# Altium PCB DPM20140124.PcbDoc (part 2 of 3)
Units mil, origin at the board's own origin, x right, y up, seen from the top; angles counter-clockwise.
Board outline 4950 x 7375 mil, 2 copper layers (Top Layer, Bottom Layer); 198 components, 330 nets, 1077 pads, 152 vias.
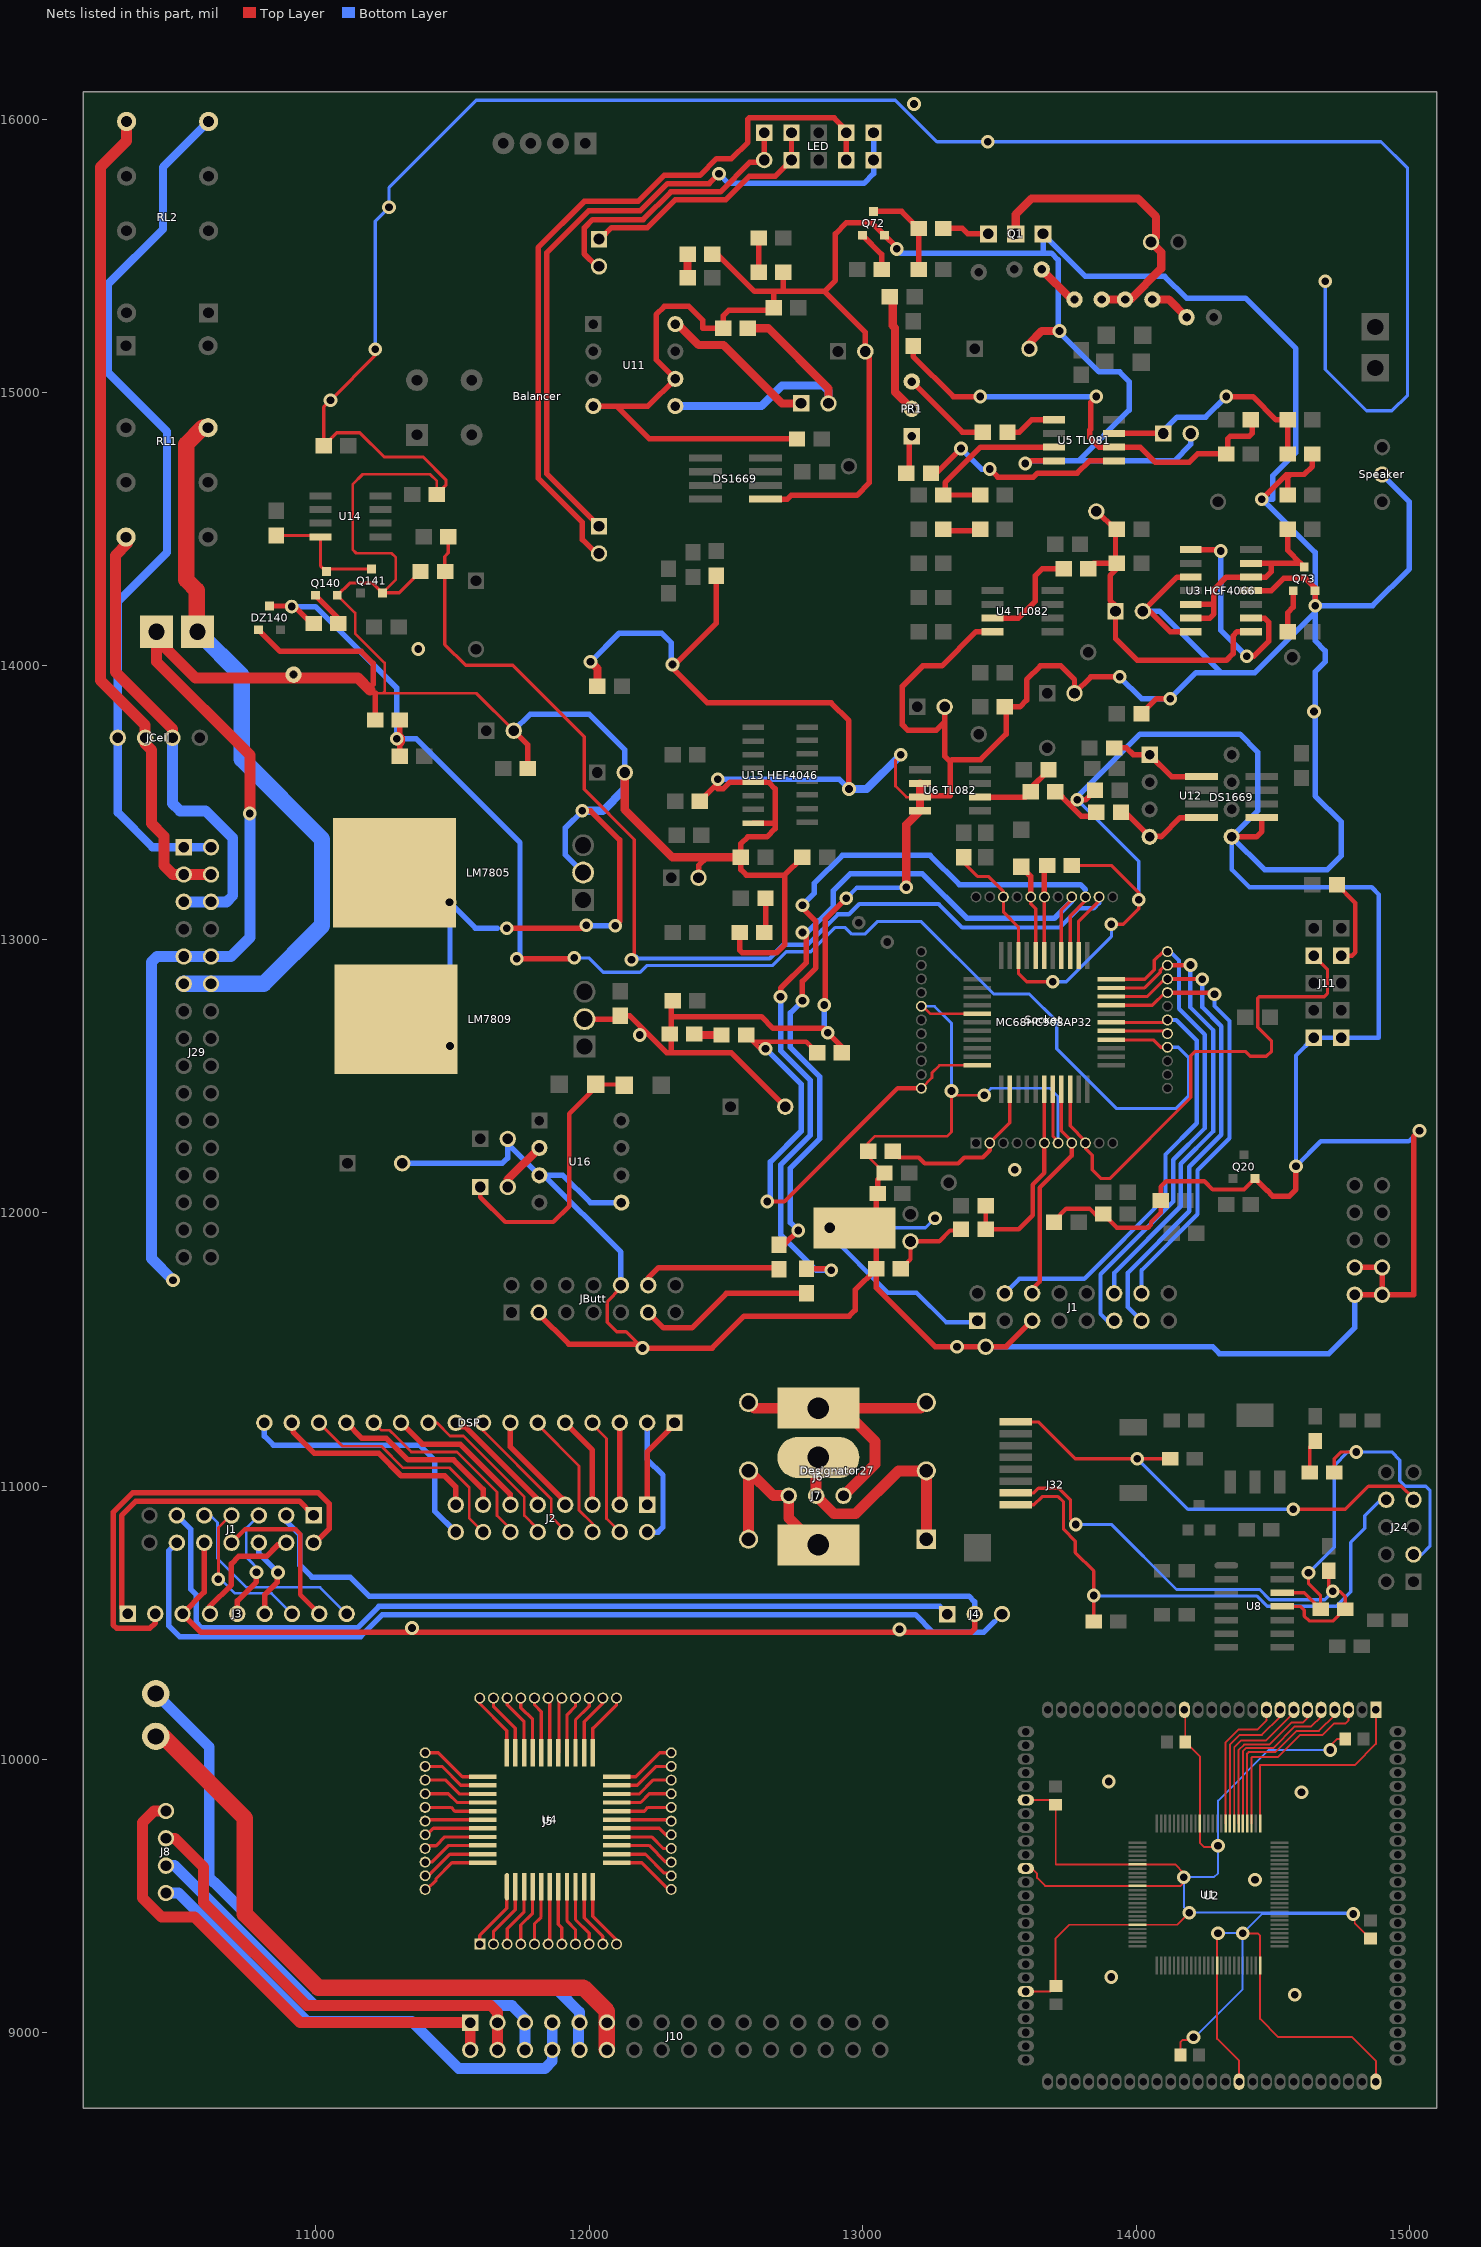
[diagram p2: the nets of this part, all layers, seen from the top]

## Via types
v1: diameter 50, hole 28, Top Layer to Bottom Layer, 152 vias

## Nets (pads, with @x,y where several pads share a name; then routed paths per layer and width w, separated by ;. In a path a pad name is that pad's centre, name@x,y a point inside that pad or via, vN(x,y) a via of type N, cw(c..) or ccw(c..) an arc to the next point about the centre after c; other vN are vias at no path point) (continued)
CS: J24.3 R92.2@14675,10550 R96.1 U8.12 | length 1637.4
  Top Layer w12: U8.12@14535,10610 14615,10610 R92.2@14675,10550 14675,10599 14631,10643 v1(14631,10683) ; R96.1@14725,11050 14725,11100 14750,11125 v1(14805,11125)
  Bottom Layer w12: v1(14631,10683) 14725,10777 14725,11075 14775,11125 v1(14805,11125) 14935,11125 14965,11095 14965,11020 14985,11000 15060,11000 15075,10985 15075,10780 15045,10750 J24.3@15015,10750
CS_: J32.2 R1.1 R92.1@14765,10550 U8.11 | length 1850.6
  Top Layer w12: J32.2@13560,10975 13626,10975 13643,10992 13718,10992 13760,10950 13760,10880 v1(13780,10860) ; U8.11@14535,10560 14601,10560 14615,10546 14615,10525 14633,10507 14722,10507 R92.1@14765,10550 14765,10595 14745,10615 v1(14720,10615) 14705,10630 R1.1@14705,10690
  Bottom Layer w12: v1(13780,10860) 13910,10860 14148,10622 14452.75,10622 14489.75,10585 14690,10585 v1(14720,10615)
DAT1: J24.7 J32.8 R95.1 | length 1776.3
  Top Layer w12: J32.8@13560,11234.84 13642.16,11234.84 13777,11100 v1(14005,11100) R95.1@14125,11100 ; v1@14570,10915 v1(14575,10915) 14765,10915 14850,11000 14970,11000 15015,10955 J24.7@15015,10950
  Bottom Layer w12: v1@14000,11100 v1(14005,11100) 14190,10915 v1(14575,10915)
DAT2: J24.8 J32.1 R90.1@13845,10505 | length 1998.1
  Top Layer w12: 13620,10931.69 13626.69,10931.69 13657,10962 13715,10962 13735,10942 13735,10842 13778,10799 13778,10757 13845,10690 v1(13845,10600) R90.1@13845,10505
  Bottom Layer w12: v1(13845,10600) 13847,10598 14442.81,10598 14479.81,10561 14732.06,10561 14785,10613.94 14785,10794 14837,10846 14837,10892 14895,10950 J24.8@14915,10950
ENCENDIDO: Q140.2 Q141.2 R140.2 U14.4 | length 467.9
  Top Layer w12: R140.2@10856,14477 11012,14477 U14.4@11017,14472 11017,14367 Q140.2@11039,14345 11048,14354 Q141.2@11204,14354
ENTREERES: R53.1 R54.2 | length 165.6
  Top Layer w30: R53.1@13655,15450 13765,15340 R54.2@13775,15340
FILTROIN: C55.2 R72.1 | length 138.3
  Top Layer w20: R72.1@13295,14500 13300,14495 13420,14495 C55.2@13430,14500
FLITMIC: C18.1 R12.1 | length 100.7
  Top Layer w30: C18.1@12385,12654 12389,12650 R12.1@12484,12650
FUSEIN: 
GND: C1.2 C2.2 C3.2 C4.2 C5.2 C6.2 U1.15 U1.31 U1.36 U1.45 U1.65 U1.75 U2.15 U2.31 U2.36 U2.45 U2.65 U2.75 | length 7267.3
  Top Layer w7: U2.45@13597,9152 13687,9152 C4.2@13707,9172 13705,9174 13705,9345 13756.02,9396.02 U1.45@14005,9396.02 14151.02,9396.02 v1(14195,9440) ; U2.36@13597,9602 13618,9602 13638,9582 13638,9567 13667.25,9537.75 U1.36@14005,9537.75 14162.75,9537.75 14175,9550 v1(14175,9570) 14175,9585 14143.51,9616.49 U1.31@14005,9616.49 13706.49,9616.49 13706.49,9833.51 C3.2@13705,9835 13688,9852 U2.31@13597,9852 ; C5.2@14163.07,8920 14163.07,8968.07 14170,8975 14200,8975 v1(14210,8985) ; U2.15@14177,10182 14180,10179 C2.2@14180,10065 14233.35,10011.65 U1.15@14233.35,9766.09 14233.35,9696.65 14250,9680 v1@14290,9680 ; v1@14296.34,9363.66 U1.65@14296.34,9246.41 14296.34,8978.66 14377,8898 U2.65@14377,8822 ; v1@14390,9363.66 14446.34,9363.66 14453.82,9356.18 U1.75@14453.82,9246.41 14453.82,9051.18 14520,8985 14790,8985 14877,8898 U2.75@14877,8822 ; v1@14702.5,10042.5 14735,10075 C1.2@14765,10075 ; v1@14800,9430 14800,9402.07 C6.2@14857,9345.07
  Bottom Layer w7: 14165,8940 14170,8940 ; v1@14212.5,8982.5 14390,9160 v1(14390,9365) ; v1(14300,9365) v1(14390,9365) ; v1(14710,10035) 14485,10035 14300,9850 v1(14300,9685) 14300,9585 14285,9570 v1(14175,9570) 14175,9460 v1(14195,9440) 14790,9440 v1(14795,9435) 14460,9435 v1(14390,9365)
  other v1: 14580,9140 13910,9205 14435,9560 14605,9880 13900,9920
GND2: J1.3@10892,10893 J1.10@10592,10793 J3.3 J4.2 | length 6057.7
  Top Layer w20: J1.10@10592,10793 10592,10612 J3.3@10513,10533 10581,10465 13397,10465 13410,10478 J4.2@13410,10532
  Bottom Layer w20: J1.3@10895,10901 10895,10896 J1.3@10892,10893 10892,10872 10942,10822 10942,10711 10986,10667 11126,10667 11195,10598 13389,10598 13410,10577 J4.2@13410,10532
  other v1: 13135,10476 11352,10481
GNDA: "U3 HCF4066.3" "U3 HCF4066.7" "U3 HCF4066.11" "U4 TL082.4" "U5 TL081.4" "U6 TL082.2" "U6 TL082.3" "U6 TL082.4" "U15 HEF4046.5" "U15 HEF4046.8" ?.3 BATTERY.1 C10.1 C11.2 C12.2 C13.1 C14.1 C15.1 C16.1 C17.2 C18.2 C19.2 C20.1 C33.2 C34.2 C35.2 C48.2 C49.2 C52.2@14555,14625 C53.2@14025,14200 C58.2 C60.2 C61.2 C62.2 C63.2 C64.2 C66.2 C67.2 C68.2 C140.1 C141.1 C151.2 C152.2 C200.2 C201.1 C204.1 C205.1 C206.1 DS1669.5 DZ140.1 J1.1@13420,11605 J1.5@13620,11605 J11.9 J11.10 J29.9 J29.10 JButt.3 JButt.10 LM7805.2 LM7809.2 MC68HC908AP32.7 MC68HC908AP32.31 MC68HC908AP32.38 pad.0@10919,13968 pad.2 pad.3 pad.4 pad.5@14800,11700 pad.34 Q1.3 Q20.3 Q72.3 Q73.3 Q140.3 Q141.3 R16.1 R22.2 R26.1 R81.2 R86.2 R89.1 R144.1 R146.1 R151.2 R152.1 R153.2 R201.1 Socket.7 Socket.31 Socket.38 Speaker.2 U11.4 U11.6 U12.5 U16.3 U16.5 | length 57911.3
  Top Layer w10: Q140.3@11079,14258 11144,14193 11144,14119 11252,14011 11252,13906 11246,13900 ; 11220,13900 11246,13900 ; Q141.3@11244,14267 11293,14316 11293,14396 11277,14412 11148,14412 11135,14425 11135,14664 11172,14701 11418,14701 11443,14676 C140.1@11443,14627 ; C62.2@11724,13763 11587,13900 11246,13900 ; 13055,11730 C11.2@13055,11795 ; C14.1@13080,12145 13020,12205 C16.1@13020,12225 13020,12255 13045,12280 13310,12280 13325,12295 v1(13325,12445) 13340,12430 v1(13445,12430) ; v1(13140,13675) 13120,13655 13120,13560 13160,13520 13210,13520 ; Socket.38@13215,12755 13220.15,12755 13247.15,12728 MC68HC908AP32.38@13419,12728
  Top Layer w12: Q140.3@11079,14258 11124,14303 11208,14303 Q141.3@11244,14267 11305,14267 R144.1@11383,14345 ; v1@11218,15152 11218,15136 v1(11054,14972) 11029,14947 C64.2@11029,14805 11077,14853 11161,14853 11250,14764 11393,14764 11476,14681 11476,14660 C140.1@11443,14627 ; JButt.10@12116,11735 12116,11725 12066,11675 12066,11599 12100,11565 12135,11565 12181,11519 v1(12195,11505) ; C13.1@13370,13300 13370,13280 13420,13230 13460,13230 13515,13175 Socket.31@13515,13155 13515,13100 13570,13045 MC68HC908AP32.31@13570,12941 13570,12875 13600,12845 v1(13695,12845) ; MC68HC908AP32.7@13696,12451 13696,12280.57 13715,12261.57 Socket.7@13715,12255 ; R26.1@13765,13270 13910,13270 14010,13170 v1(14010,13145) 14010,13112 13953,13055 v1(13910,13055)
  Top Layer w16: C20.1@13700,11965 13700,11970 13745,12015 13830,12015 13850,11995 C17.2@13880,11995 13930,11945 14045,11945 14055,11955 14055,11965 14090,12000 R22.2@14090,12045 14090,12095 14110,12115 14250,12115 14280,12085 14395,12085 Q20.3@14435,12125
  Top Layer w20: DZ140.1@10791,14132 10870,14053 11166,14053 11210,14009 11210,13932 ; R146.1@11217,13802 11217,13897 11220,13900 ; LM7805.2@11288,13244 11299,13244 LM7805.2@11378,13165 ; v1@11698,13040 11975,13040 v1@11990,13055 ; C62.2@11724,13763 11775,13712 C60.2@11775,13625 ; JButt.3@11816,11635 11813,11632 11926,11519 v1@12181,11519 ; v1(11975,13470) 12005,13470 12111,13364 12111,13066 v1(12095,13050) ; LM7809.2@11983,12708 12102,12708 C68.2@12114,12720 12149,12720 12283.5,12585.5 12300,12585.5 ; U11.4@12015,14950 12215,14950 U11.6@12315,15050 12245,15120 12245,15285 12275,15315 12365,15315 12415,15265 12415,15235 C204.1@12490,15235 12490,15280 12510,15300 12675,15300 C201.1@12675,15310 12675,15370 ; 12105,14945 12220,14830 R153.2@12760,14830 ; U16.5@12116,12035 U16.5@12118,12037 ; v1(12195,11505) 12450,11505 12567,11622 12951,11622 12973,11644 12973,11718 C11.2@13050,11795 ; C15.1@12305,12775 12300,12775 12300,12710 ; C151.2@12400,13225 12400,13270 12430,13300 ; R151.2@12405,13505 v1@12470,13570 ; C206.1@12450,15505 12470,15505 12605,15370 12675,15370 ; R201.1@12465,14330 12465,14156 12303,13994 12432,13865 12885,13865 12950,13800 v1(12950,13550) ; v1(12470,13585) v1@12470,13570 ; C10.1@12550,13025 12550,12960 12560,12950 12685,12950 12715,12980 12715,13235 ; 12600,13424.96 12600.04,13425 12680,13425 ; 12600,13574.96 12599.96,13575 ; DS1669.5@12645,14610 12725,14610 12739,14624 12979,14624 13025,14670 13025,15135 C200.2@13010,15150 13010,15220 12860,15370 ; C205.1@12710,15440 12710,15370 ; C67.2@12717,12388 12519.5,12585.5 12300,12585.5 ; C152.2@12780,13300 12715,13235 ; v1(12860,12760) 12863,12763 12863,13073 v1(12940,13150) ; C19.2@12924,12585 12924,12607 v1(12873,12658) 12857,12674 12673,12674 12630,12717 12307,12717 12300,12710 ; C14.1@13080,12145 13055,12120 C12.2@13055,12070 13050,12065 C11.2@13050,11795 ; v1(13125,15525) 13125,15530 Q72.3@13080,15575 13035,15620 12940,15620 12900,15580 12900,15410 12860,15370 ; 13250,13525 13320,13525 13320,13650 ; C35.2@13300,13850 13300,13795 ; 13475,14125 13415,14125 13290,14000 13220,14000 13145,13925 13145,13785 13165,13765 13270,13765 13300,13795 ; v1@13610,14750 13700,14750 ; J1.5@13620,11605 13525,11510 pad.34@13450,11510 v1(13345,11510) 13265,11510 13050,11725 C11.2@13050,11795 ; R89.1@13705,13540 13710.17,13540 13755.17,13495 ; R86.2@13830,13450 13800.17,13450 13755.17,13495 ; R16.1@13850,13545 13815,13510 v1(13785,13510) 13770,13495 13755.17,13495 ; v1(13940,13960) 13835,13960 C33.2@13775,13900 13775,13950 13725,14000 13650,14000 13600,13950 13600,13875 13575,13850 R81.2@13520,13850 13525,13845 13525,13750 13432,13657 13327,13657 13320,13650 ; C48.2@14020,13825 14075,13880 v1(14125,13880) ; 14200,14125 14125,14125 14050,14200 C53.2@14025,14200 14150,14325 14200,14325 ; U12.5@14350,13375 14440,13375 14460,13395 DS1669.5@14460,13445 ; 14420,14275 14495,14275 14540,14320 14620,14320 14655,14285 Q73.3@14655,14275 v1(14655,14220) ; Q20.3@14435,12125 14477.5,12082.5 14478.2,12082.5 14499.7,12061 14561,12061 14585,12085 v1(14585,12170) ; v1(14460,14610) 14550,14700 14565,14700 ; C52.2@14555,14625 14555,14690 14565,14700 ; C49.2@14645,14775 14645,14730 14615,14700 14565,14700 ; pad.5@14800,11700 pad.3@14900,11700 ; pad.4@14800,11800 pad.2@14900,11800 pad.3@14900,11700 ; v1@15036.5,12299.5 15015,12278 15015,11700 pad.3@14900,11700 ; 12300,12585.5 12300,12710 ; v1@12470,13570 12470,13550 12490,13550 12515,13575 12599.96,13575 ; 12599.96,13575 12655,13575 12680,13550 12680,13425 ; 12675,15370 12710,15370 ; 12680,13425 12680,13405 12650,13375 12580,13375 12555,13350 R152.1@12555,13300 12555,13255 12575,13235 12715,13235 ; 12710,15370 12860,15370 ; 13300,13795 13300,13670 13320,13650
  Top Layer w30: v1(12005,14015) 12030,13990 C141.1@12030,13925 ; C61.2@12130,13610 12130,13475 12305,13300 12430,13300 R152.1@12555,13300 ; v1(13160,13190) 13160,13420 13210,13470 ; 13210,13475 13210,13520 13210,13570 ; C58.2@13610,15160 13610,15180 13655,15225 v1(13720,15225)
  Top Layer w40: BATTERY.1@10418,14125 BATTERY.1@10418,14098 ; v1(10759,13460) 10759,13674 10418,14015 BATTERY.1@10418,14098 ; 11199,13911 11154,13956 10560,13956 BATTERY.1@10418,14098
  Bottom Layer w10: Socket.38@13215,12755 13263,12755 13325,12693 v1(13325,12445) ; v1(13445,12430) 13470,12455 13685,12455 13715,12425 Socket.7@13715,12255
  Bottom Layer w12: v1(11218,15158) 11218,15627 v1(11268,15677) 11268,15750 11587,16069 13120,16069 13272,15917 v1(13458,15917) 14896,15917 14993,15820 14993,14990 14936,14933 14843,14933 14692,15084 v1(14692,15407) ; ?.3@12880,11945 13230,11945 v1(13265,11980) ; v1(13695,12845) 13745,12845 13910,13010 v1(13910,13055) ; v1(13785,13510) 14010,13285 v1(14010,13145)
  Bottom Layer w16: ?.3@12880,11920 13092.27,11707.73 13197.27,11707.73 13305,11600 J1.1@13400,11600 ; v1(12940,13150) 12978,13188 13158,13188 v1(13160,13190) ; U12.5@14350,13375 14350,13255 14415,13190 14862,13190 14888,13164 14888,12640 J11.10@14750,12640 J11.9@14650,12640 14585,12575 v1(14585,12170) 14676,12261 14992,12261 ; 14998,12261 v1(15037,12300)
  Bottom Layer w20: C63.2@11316,12181 11683,12181 11702,12200 C66.2@11702,12253 ; v1(11489,13136) v1@11491,13134 ; v1(11491,12610) v1@11491,13134 ; 11664,13041 11584,13041 v1@11491,13134 ; C66.2@11702,12270 C66.2@11702,12253 ; C62.2@11724,13763 11784,13823 12001,13823 12130,13694 C61.2@12130,13610 ; U16.3@11818,12137 C66.2@11702,12253 ; U16.3@11826.5,12145.5 U16.3@11835,12137 ; v1(11975,13470) 11913,13408 11913,13309 LM7805.2@11978,13244 ; v1@11991,13050 v1(12095,13050) ; v1(12005,14015) 12110,14120 12265,14120 12300,14085 12300,14010 v1(12305,14005) ; JButt.10@12116,11735 12116,11856 U16.3@11835,12137 ; U16.5@12118,12037 12004,12037 11904,12137 U16.3@11835,12137 ; v1(12470,13585) 12915,13585 v1(12950,13550) ; v1@12860,12660 v1(12860,12760) ; v1(13125,15525) 13140,15510 13660,15510 ; pad.34@13450,11510 14280,11510 14305,11485 14705,11485 14800,11580 pad.5@14800,11700 ; v1(13595,14740) 13605,14750 13790,14750 ; v1(13785,13510) 13785,13520 14015,13750 14380,13750 14445,13685 14445,13470 U12.5@14350,13375 14470,13255 14700,13255 14750,13305 14750,13430 14655,13525 14655,13977.7 14692,14014.7 14692,14055.3 14655,14092.3 14655,14195 ; v1(13940,13960) 14020,13880 v1(14125,13880) 14220,13975 14310,13975 ; C53.2@14025,14200 14085,14200 14310,13975 ; C34.2@14200,14850 14200,14810 14140,14750 13790,14750 ; Speaker.2@14900,14700 15000,14600 15000,14355 14865,14220 v1(14655,14220) ; 13660,15510 Q1.3@13660,15580 13815,15425 14105,15425 14185,15345 14400,15345 14585,15160 14585,14780 14500,14695 14500,14610 v1(14460,14610) 14655,14415 v1(14655,14220) ; 13660,15510 13690,15510 13715,15485 13715,15225 13865,15075 13940,15075 13975,15040 13975,14935 13790,14750 ; 14310,13975 14435,13975 14655,14195 ; 14655,14195 v1(14655,14220)
  Bottom Layer w30: v1(11975,13470) 12050,13470 12130,13550 C61.2@12130,13610 ; v1(12950,13550) 13015,13550 v1(13140,13675)
  Bottom Layer w40: v1(10478,11753) 10399,11832 10399,12917 10419,12937 J29.9@10517,12937 J29.10@10617,12937 10690,12937 10759,13006 v1(10759,13460) v1@10759,13469
  other v1: 13557,12157 12185,12650 11698,13041 11989,13052 14651,13833 11375,14062 13188,16055
INAUDFIOD: C203.2 C204.2 U11.5 | length 1092.5
  Top Layer w30: C204.2@12585,15230 C204.2@12580,15235 12655,15235 12875,15015 C203.2@12875,14960
  Bottom Layer w30: U11.5@12315,14950 12630,14950 12705,15025 12855,15025 12875,15005 C203.2@12875,14960
INDIAOUT: 
IRQ: J11.4 R17.1 | length 332.7
  Top Layer w16: R17.1@14735,13200 14802,13133 14802,12952 14790,12940 J11.4@14750,12940
IRQINT: J11.3 MC68HC908AP32.9 Socket.9 | length 1930
  Top Layer w12: MC68HC908AP32.9@13759,12451 13759,12317.57 13815,12261.57 Socket.9@13815,12255 13815,12236 13840,12211 13840,12157 13872,12125 13903.64,12125 14200,12421.36 14200,12574 14216,12590 14399,12590 14417,12572 14477,12572 14495.82,12590.82 14495.82,12627.82 14445,12678.64 14445,12785 14450,12790 14688.28,12790 14700,12801.72 14700,12890 J11.3@14650,12940
KEWPWRBASE: Q140.1 R142.1 | length 137.4
  Top Layer w20: Q140.1@10999,14258 11082,14175 R142.1@11082,14155
KEY_SENSE: DZ140.3 MC68HC908AP32.15 pad.1 R142.2 R145.2 R146.2 Socket.15 | length 5454.7
  Top Layer w12: MC68HC908AP32.15@13910,12632 14063,12632 14090,12605 Socket.15@14115,12605
  Top Layer w20: DZ140.3@10831,14219 10921,14219 10985,14155 R142.2@10992,14155 ; v1(11296,13734) 11307,13723 R145.2@11307,13670 ; v1@11307,13734 R146.2@11307,13802 ; v1(11735,12929) 11942,12929 v1(11945,12932)
  Top Layer w40: v1@11307,13723 v1@11307,13734
  Bottom Layer w12: v1(11945,12932) 11998,12932 12051,12879 12186,12879 12211,12904 12670,12904 12719,12953 12720,12953 12721,12954 12810,12954 12899,13043 12937,13043 12961,13019 13008,13019 13054,13065 13215,13065 13480,12800 13610,12800 13710,12700 13710,12600 13929,12381 14145.65,12381 14193,12428.35 14193,12567 14155,12605 Socket.15@14115,12605
  Bottom Layer w20: pad.1@10912,14217 10999,14217 11296,13920 v1(11296,13734) 11367,13734 11747,13354 11747,12941 v1(11735,12929)
LCDDATA1: J1.11@13920,11605 MC68HC908AP32.22 Socket.22 | length 1854.6
  Top Layer w12: MC68HC908AP32.22@13910,12854 14031.98,12854 14067,12889.02 14067,12923 14099,12955 Socket.22@14115,12955
  Bottom Layer w16: J1.11@13900,11600 13870,11630 13870,11775 14136,12041 14136,12193.61 14252,12309.61 14252,12651 14157,12746 14157,12922.4 14124.4,12955 Socket.22@14115,12955
LCDDATA2: J1.12@13920,11705 MC68HC908AP32.21 Socket.21 | length 1719.9
  Top Layer w12: MC68HC908AP32.21@13910,12822 14031.09,12822 14089,12879.91 14089,12887 14107,12905 Socket.21@14115,12905
  Top Layer w16: Socket.21@14115,12905 v1@14201,12905
  Bottom Layer w16: J1.12@13920,11700 J1.12@13920,11705 13920,11780 14164,12024 14164,12179.18 14282,12297.18 14282,12668 14199,12751 v1(14199,12906)
LCDDATA3: J1.13@14020,11605 MC68HC908AP32.20 Socket.20 | length 1800.9
  Top Layer w12: MC68HC908AP32.20@13910,12791 14042,12791 14106,12855 Socket.20@14115,12855
  Top Layer w16: Socket.20@14115,12855 v1@14244,12855
  Bottom Layer w16: J1.13@14020,11605 13970,11655 13970,11780 14195,12005 14195,12167.75 14312,12284.75 14312,12682 14242,12752 v1(14242,12854)
LCDDATA4: J1.14@14020,11705 MC68HC908AP32.19 Socket.19 | length 1642.2
  Top Layer w12: MC68HC908AP32.19@13910,12759 14060,12759 14106,12805 Socket.19@14115,12805
  Top Layer w16: Socket.19@14115,12805 v1@14283,12805
  Bottom Layer w16: J1.14@14020,11705 14020,11789 14225,11994 14225,12155.33 14342,12272.33 14342,12701 14287,12756 v1(14287,12799)
LCDE: J1.6@13620,11705 MC68HC908AP32.8 Socket.8 | length 821.8
  Top Layer w12: MC68HC908AP32.8@13727,12451 13727,12299.57 13765,12261.57 Socket.8@13765,12255
  Top Layer w16: J1.6@13620,11705 13620,11720 13648,11748 13648,12092 13765,12209 Socket.8@13765,12255
LCDRS: J1.4@13520,11705 MC68HC908AP32.17 Socket.17 | length 1708
  Top Layer w12: MC68HC908AP32.17@13910,12696 14097,12696 14106,12705 Socket.17@14115,12705
  Bottom Layer w16: J1.4@13500,11716.11 J1.4@13504.44,11720.56 ; J1.4@13520,11705 13573,11758 13810.57,11758 14108,12055.43 14108,12213 14222,12327 14222,12630 14147,12705 Socket.17@14115,12705
LECCDO: 
LED1: MC68HC908AP32.25 R29.1 Socket.25 | length 2842.7
  Top Layer w12: MC68HC908AP32.25@13759,12941 13759,13085 13815,13141 Socket.25@13815,13155
  Top Layer w20: R29.1@12715,11883 12715,11885 v1(12765,11935) ; v1(12780,12775) 12780,12846 12829,12895 12829,13066 12780,13115 v1(12780,13125)
  Bottom Layer w20: v1(12765,11935) 12736,11964 12736,12162.83 12843,12269.83 12843,12498.17 12736,12605.17 12736,12731 v1(12780,12775) ; v1(12780,13125) 12824,13169 12824,13205.17 12925.83,13307 13247.25,13307 13354.25,13200 13797,13200 13815,13182
LED2: MC68HC908AP32.26 R36.1 Socket.26 | length 3015.6
  Top Layer w12: MC68HC908AP32.26@13727,12941 13727,13106 13765,13144 Socket.26@13765,13155
  Top Layer w20: v1(12700,12790) 12700,12821 12794,12915 12794,13011 v1(12780,13025) ; R36.1@12795,11795 12880,11795 v1(12885,11790)
  Bottom Layer w20: v1(12700,12790) 12700,12593.08 12809,12484.08 12809,12283.92 12700,12174.92 12700,11920 12830,11790 v1(12885,11790) ; v1(12780,13025) 12797.38,13025 12893,13120.62 12893,13178 12954,13239 13219.08,13239 13381.08,13077 13701,13077 13765,13141 Socket.26@13765,13155
LEDCNDO: 
LLAVEDISP: "U3 HCF4066.5" "U3 HCF4066.6" "U3 HCF4066.12" "U3 HCF4066.13" Q73.2 R83.1 | length 878
  Top Layer w20: 14200,14175 14270,14175 14285,14190 14285,14225 ; 14200,14225 14285,14225 ; 14420,14375 14495,14375 ; R83.1@14555,14500 14555,14422 Q73.2@14602,14375 ; Q73.2@14615,14362 Q73.2@14602,14375 ; 14285,14225 14285,14280 14330,14325 14420,14325 14475,14325 14495,14345 14495,14375 ; 14495,14375 Q73.2@14602,14375
LLAVEINTER: "U3 HCF4066.1" "U3 HCF4066.9" | length 755.4
  Top Layer w20: 14200,14425 14305,14425 v1(14310,14420) ; 14420,14175 14470,14175 14485,14160 14485,14090 14430,14035
  Bottom Layer w20: v1(14310,14420) 14310,14130 v1(14405,14035)
LLAVEPOUT: "U3 HCF4066.8" C53.1@13925,14200 C54.2 R69.1 R74.2 TP3.1 | length 1264.2
  Top Layer w20: R69.1@13825,14355 13845,14375 13925,14375 C54.2@13925,14350 ; TP3.1@13855,14565 R74.2@13925,14500 ; R74.2@13930,14500 R74.2@13925,14500 ; 14420,14125 14370,14125 14355,14110 14355,14045 14330,14020 14005,14020 13925,14100 C53.1@13925,14200 13925,14220 13905,14240 13905,14330 C54.2@13925,14350 ; C54.2@13925,14350 13930,14355 C54.2@13930,14375 13925,14380 R74.2@13925,14500
LM317ADJ: MC68HC908AP32.16 Socket.16 | length 209.1
  Top Layer w12: MC68HC908AP32.16@13910,12665 14105,12665 Socket.16@14115,12655
LM317IN: 
LMSALIDA1: "U5 TL081.6" C50.2 R51.2 R65.1 | length 1689.4
  Top Layer w20: R51.2@13185,15170 13185,15131.92 13331.92,14985 v1(13430,14985) ; v1(13855,14985) 13834,14964 13834,14865.92 13830,14861.92 13830,14835 13865,14800 13920,14800 14015,14800 14070,14745 14195,14745 14225,14775 R65.1@14330,14775 14335,14780 14335,14830 14345,14840 14415,14840 14425,14850 14425,14900 C50.2@14420,14900
  Bottom Layer w20: v1(13430,14985) v1(13855,14985)
MEDIR_VCC: MC68HC908AP32.24 R143.1 R144.2 Socket.24 | length 4084.5
  Top Layer w12: R143.1@11485,14472 11485,14413 11472,14400 11472,14078 11548,14002 11721,14002 11982,13741 11982,13548 12165,13365 12165,12935 v1(12155,12925) ; MC68HC908AP32.24@13790,12941 13790,13066 13865,13141 Socket.24@13865,13155
  Bottom Layer w16: v1(12155,12925) 12166,12936 12171.57,12936 12177.57,12930 12660,12930 12710,12980 12798.06,12980 12852.53,13034.47 ; 12852.82,13034.18 12909.64,13091 12949.53,13091 12987.53,13129 13278,13129 13364,13043 13721,13043 13791.5,13113.5 13846,13113.5 13865,13132.5 Socket.24@13865,13155
N4V7: 
N47MV: 
NET00000: "U5 TL081.1" R66.2 | length 188.6
  Top Layer w20: R66.2@13530,14855 13573,14855 13618,14900 13700,14900
NET00001: "U5 TL081.5" R67.2 | length 775.6
  Top Layer w20: R67.2@13250,14705 13270,14705 v1(13360,14795) ; v1(13465,14720) 13495,14690 13625,14690 13640,14705 13785,14705 13830,14750 13920,14750
  Bottom Layer w20: v1(13360,14795) 13435,14720 v1(13465,14720)
NET00002: JButt.12 R29.2 | length 522.2
  Top Layer w20: JButt.12@12216,11735 12216,11761 12254,11799 12688,11799 R29.2@12694,11793
NET00003: JButt.11 R36.2 | length 654.4
  Top Layer w20: JButt.11@12216,11635 12272,11579 12376,11579 12502,11705 R36.2@12795,11705
NET00004: 
NET00008: C205.2 R202.1 | length 125
  Top Layer w20: C205.2@12620,15440 R202.1@12620,15565
NET00011: C206.2 R203.1 | length 85
  Top Layer w30: R203.1@12360,15420 C206.2@12360,15505
NET00012: C203.1 U11.8 | length 580.1
  Top Layer w30: U11.8@12315,15250 12323.63,15250 12400.39,15173.24 12491.76,15173.24 12705,14960 C203.1@12775,14960
NET00022: "U5 TL081.7" C34.1 C49.1 R57.2 | length 857
  Top Layer w20: 13920,14850 C34.1@14100,14850 ; v1(14330,14985) 14427,14985 14512,14900 R57.2@14555,14900 C49.1@14555,14775
  Bottom Layer w20: C34.1@14100,14850 14100,14860 14150,14910 14255,14910 v1(14330,14985)
NET00035: C10.2 R14.2 | length 125
  Top Layer w20: C10.2@12645,13025 R14.2@12645,13150
NET00046: MC68HC908AP32.28 R26.2 Socket.28 | length 333.6
  Top Layer w12: MC68HC908AP32.28@13664,12941 13664,13154 Socket.28@13665,13155
  Top Layer w20: Socket.28@13665,13155 13665,13260 R26.2@13675,13270
NET00052: MC68HC908AP32.29 R19.2 Socket.29 | length 346
  Top Layer w12: Socket.29@13615,13155 13615,13130 13633,13112 MC68HC908AP32.29@13633,12941
  Top Layer w20: R19.2@13580,13265 13615,13230 Socket.29@13615,13155
NET00069: "U6 TL082.6" R89.2 R90.1@13680,13620 | length 300.2
  Top Layer w20: 13430,13520 13595,13520 R89.2@13615,13540 13615,13553.06 13680,13618.06 R90.1@13680,13620
NET00070: DS1669.1@14240,13595 R85.2 U12.1 | length 353.5
  Top Layer w20: R85.2@13920,13700 13965,13700 13990,13675 U12.1@14050,13675 14130,13595 DS1669.1@14230,13595
NET00071: DS1669.4@14240,13445 R86.1 U12.4 | length 364.4
  Top Layer w20: R86.1@13945,13465 13960,13465 U12.4@14048.45,13376.55 ; U12.4@14050,13375 U12.4@14048.45,13376.55 ; 14091,13375 14092.55,13376.55 ; DS1669.4@14240,13445 14161,13445 14092.55,13376.55 ; U12.4@14048.45,13376.55 14092.55,13376.55
NET00102: C65.1 D1.2 D2.1 | length 1014.7
  Top Layer w16: C65.1@11602,12094 11602,12057 11693,11966 11869,11966 11927,12024 11927,12362 12024,12459 D2.1@12024,12469 12127,12469 D1.2@12129,12467
NET00103: C65.2 U16.2 | length 191
  Top Layer w30: C65.2@11702,12094 11702,12121 U16.2@11818,12237
NET00107: "U5 TL081.3" R52.2 R88.2 | length 635.1
  Top Layer w20: R88.2@13430,14625 R52.2@13295,14625 13302,14632 13302,14670.53 13431.47,14800 13700,14800
NET00110: Bobin.1 Q1.2 R54.1 R56.2 | length 1107.2
  Top Layer w30: Q1.2@13560,15580 13560,15646 ; 13560,15651 13618,15709 14007,15709 14073,15643 14073,15568 Bobin.1@14055,15550 14092,15513 14092,15452.61 13979.39,15340 R56.2@13960,15340 R54.1@13875,15340
NET00111: R55.2 R56.1 | length 151.9
  Top Layer w30: R56.1@14060,15340 14120,15340 R55.2@14185,15275
NET00112: Q1.1 R62.1 | length 173.3
  Top Layer w20: R62.1@13295,15600 13365,15600 13385,15580 Q1.1@13460,15580
NET00113: Q72.2 R62.2 R63.2 | length 347.8
  Top Layer w20: Q72.2@13040,15662 13143,15662 R62.2@13205,15600 R63.2@13205,15450 R63.2@13210,15455
NET00114: Q72.1 R82.1 | length 161.1
  Top Layer w20: Q72.1@12995,15570 Q72.1@13000,15575 13070,15505 R82.1@13070,15450
NET00115: PR1.1 R67.1 | length 139.1
  Top Layer w20: R67.1@13160,14705 13170,14715 PR1.1@13170,14840
NET00116: PR1.3 R66.1 | length 346.5
  Top Layer w20: PR1.3@13180,15040 13365,14855 R66.1@13440,14855 R66.1@13433,14848
NET00117: PR1.2 R64.2 | length 467.3
  Top Layer w30: R64.2@13090,15350 13100,15340 R64.2@13100,15350 13110,15340 13110,15245.15 13119,15236.15 13119,15001 PR1.2@13180,14940
NET00124: Q73.1 R84.1 | length 158.3
  Top Layer w20: R84.1@14555,14125 14555,14195 14575,14215 Q73.1@14575,14275
NET00128: "U4 TL082.3" R69.2 | length 389
  Top Layer w20: 13475,14175 13570,14175 13632,14237 13632,14330 13657,14355 R69.2@13735,14355
NET00132: MC68HC908AP32.6 R10.2 R11.1 Socket.6 | length 728.2
  Top Layer w12: MC68HC908AP32.6@13664,12451 13664,12256 Socket.6@13665,12255
  Top Layer w16: R10.2@13445,11935 R10.2@13450,11935 ; R10.2@13450,11940 R11.1@13450,12025 ; 13483,11940 13570.81,11940 13622,11991.19 13622,12102.77 13665,12145.77 Socket.6@13665,12255
NET00134: C19.1 MC68HC908AP32.44 R12.2 Socket.44 | length 2013.2
  Top Layer w10: Socket.44@13215,12455 13254,12494 13254,12512 13281,12539 MC68HC908AP32.44@13419,12539
  Top Layer w16: R12.2@12574,12650 R12.2@12599,12625 ; v1@12645,12592 12632,12592 R12.2@12599,12625 ; v1(12645,12600) v1@12657,12588 ; v1(12651,12041) 12714,12041 13128,12455 Socket.44@13215,12455 ; C19.1@12834,12585 12794,12625 R12.2@12599,12625
  Bottom Layer w20: v1(12645,12600) 12775,12470 12775,12298 12663,12186 12663,12052 12652,12041 v1(12651,12041)
NET00144: C11.1 R10.1 X2.1 | length 321.1
  Top Layer w16: C11.1@13140,11795 13175,11830 X2.1@13175,11895 13280,11895 13320,11935 R10.1@13365,11935
NET00160: C16.2 MC68HC908AP32.2 Socket.2 | length 595.8
  Top Layer w12: Socket.2@13465,12255 13465,12255.91 13538,12328.91 13538,12400
  Top Layer w16: C16.2@13110,12225 13133,12202 13205,12202 13227,12180 13350,12180 13372,12202 13439,12202 13465,12228 Socket.2@13465,12255
NETA: DSP.1 J2.1 | length 341.4
  Top Layer w20: J2.1@12212,10932 12212,11125 12312,11225 DSP.1@12312,11232
NETB: DSP.2 J2.2 | length 498.5
  Top Layer w10: DSP.2@12212,11205 DSP.2@12212,11232
  Bottom Layer w20: J2.2@12212,10832 12252,10832 12270,10850 12270,11040 12212,11098 DSP.2@12212,11232
NETC: DSP.3 J2.3 | length 300
  Top Layer w20: J2.3@12112,10932 DSP.3@12112,11232
NetC61_1: 
NetC61_2: 
NetC62_1: 
NetC62_2: 
NetC63_1: 
NETD: DSP.4 J2.4 | length 441.4
  Top Layer w10: DSP.4@12012,11232 12012,11225 12063,11174 12063,10881 J2.4@12112,10832
NetD4_2: D4.2@14655,11165 R96.2 | length 123.3
  Top Layer w12: R96.2@14635,11050 14635,11145 D4.2@14655,11165
NETE: DSP.5 J2.5 | length 341.4
  Top Layer w20: DSP.5@11912,11232 12012,11132 J2.5@12012,10932
NETF: DSP.6 J2.6 | length 482.8
  Top Layer w10: DSP.6@11812,11232 11812,11225 11963,11074 11963,10911.7 12012,10862.7 J2.6@12012,10832
NETG: DSP.7 J2.7 | length 382.8
  Top Layer w20: DSP.7@11712,11232 11712,11144 11901,10955 11901,10943 J2.7@11912,10932
NETH: DSP.8 J2.8 | length 524.3
  Top Layer w10: DSP.8@11612,11232 11612,11203 11861,10954 11861,10889 11912,10838 J2.8@11912,10832
NETI: DSP.9 J2.9 | length 436
  Top Layer w20: DSP.9@11512,11232 11527.15,11216.85 11547.17,11216.85 11812,10952.02 J2.9@11812,10932
NETJ: DSP.10 J2.10 | length 612
  Top Layer w10: DSP.10@11412,11232 11442.7,11232 11491.7,11183 11540.01,11183 11763,10960.01 11763,10892 11812,10843 J2.10@11812,10832
NetJ1_1: J1.1@10992,10893 J3.1 | length 1120.4
  Top Layer w20: J3.1@10313,10533 10290,10556 10290,10892.57 10342.43,10945 10940,10945 J1.1@10986,10899 ; J1.1@10992,10893 J1.1@10986,10899 ; J1.1@10992,10899 J1.1@10986,10899
NetJ1_2: J1.2@10992,10793 J3.2 | length 1630
  Top Layer w20: J3.2@10413,10533 10413,10500 10392.5,10479.5 10272.34,10479.5 10258.84,10493 10258.84,10903.84 10330,10975 11010,10975 11049,10936 11049,10844 J1.2@11004,10799 ; J1.2@10992,10793 10998,10793 J1.2@11004,10799 ; J1.2@10992,10799 J1.2@11004,10799
NetJ1_4: J1.4@10892,10793 J3.4 | length 448.2
  Top Layer w20: J3.4@10613,10533 10613,10561 10691,10639 10691,10716 10718,10743 10819,10743 10861,10785 10884,10785 J1.4@10892,10793
NetJ1_5: J1.5@10792,10893 J3.5 | length 429.4
  Top Layer w20: J3.5@10713,10533 10713,10580 10783,10650 v1(10783,10685)
  Bottom Layer w10: J1.5@10792,10893 10746,10847 10746,10740 v1@10800,10686
NetJ1_6: J1.6@10792,10793 J3.6 | length 308
  Top Layer w20: J3.6@10813,10533 10813,10602 10859,10648 v1@10859,10684
  Bottom Layer w20: J1.6@10792,10793 10792,10754 v1(10862,10684)
NetJ1_7: J1.7@10692,10893 J3.7 | length 567.8
  Top Layer w10: v1@10645,10670 10644,10671 10644,10849 10688,10893 J1.7@10692,10893
  Bottom Layer w10: v1(10643,10659) 10653,10659 10704,10608 10838,10608 J3.7@10913,10533
NetJ1_8: J1.8@10692,10793 J3.8 | length 598.9
  Top Layer w16: J1.8@10692,10793 10741,10842 10927,10842 ; 10927,10841 10943,10825 10943,10603 J3.8@11013,10533
NetJ1_9: J1.9@10592,10893 J3.9 | length 747.4
  Bottom Layer w10: J1.9@10592,10893 10615,10893 10641,10867 10641,10735 10746,10630 11016,10630 J3.9@11113,10533
NetJ1_11: J1.11@10492,10893 J4.1 | length 3219.4
  Bottom Layer w20: J1.11@10492,10893 10542,10843 10542,10623 10563,10602 10563,10501 10581,10483 11154,10483 11231,10560 13282,10560 J4.1@13310,10532
NetJ1_12: J1.12@10492,10793 J4.3 | length 3428.8
  Bottom Layer w20: J1.12@10492,10793 10463,10764 10463,10489 10502,10450 11164,10450 11244,10530 13193,10530 13258,10465 13443,10465 13483,10505
NetJ5_1: J5.1 U4.1 | length 251
  Top Layer w12: J5.1@11600,9325 11600,9356.77 11699,9455.77 U4.1@11699,9535
NetJ5_2: J5.2 U4.2 | length 243.1
  Top Layer w12: J5.2@11650,9325 11650,9370 11730,9450 U4.2@11730,9535
NetJ5_3: J5.3 U4.3 | length 235.7
  Top Layer w12: J5.3@11700,9325 11700,9381.77 11762,9443.77 U4.3@11762,9535
NetJ5_4: J5.4 U4.4 | length 227.8
  Top Layer w12: J5.4@11750,9325 11750,9395 11793,9438 U4.4@11793,9535
NetJ5_5: J5.5 U4.5 | length 220.4
  Top Layer w12: J5.5@11800,9325 11800,9400 11824,9424 11824,9534 U4.5@11825,9535
NetJ5_6: J5.6 U4.6 | length 212.5
  Top Layer w12: J5.6@11850,9325 11856,9331 U4.6@11856,9535
NetJ5_7: J5.7 U4.7 | length 215.4
  Top Layer w12: U4.7@11887,9535 11887,9398 11900,9385 J5.7@11900,9325
NetJ5_8: J5.8 U4.8 | length 222.8
  Top Layer w12: U4.8@11919,9535 11919,9409.23 11950,9378.23 J5.8@11950,9325
NetJ5_9: J5.9 U4.9 | length 230.7
  Top Layer w12: U4.9@11950,9535 11950,9415 12000,9365 J5.9@12000,9325
NetJ5_10: J5.10 U4.10 | length 238.2
  Top Layer w12: U4.10@11982,9535 11982,9421.23 12050,9353.23 J5.10@12050,9325
NetJ5_11: J5.11 U4.11 | length 246
  Top Layer w12: U4.11@12013,9535 12013,9427 12100,9340 J5.11@12100,9325
NetJ5_12: J5.12 U4.12 | length 239.6
  Top Layer w12: U4.12@12101,9623 12192,9623 12290,9525 J5.12@12300,9525
NetJ5_13: J5.13 U4.13 | length 231.7
  Top Layer w12: U4.13@12101,9654 12206,9654 12275,9585 12290,9585 J5.13@12300,9575
NetJ5_14: J5.14 U4.14 | length 224.3
  Top Layer w12: U4.14@12101,9686 12219,9686 12280,9625 J5.14@12300,9625
NetJ5_15: J5.15 U4.15 | length 216.4
  Top Layer w12: U4.15@12101,9717 12228,9717 12270,9675 J5.15@12300,9675
NetJ5_16: J5.16 U4.16 | length 208.9
  Top Layer w12: U4.16@12101,9749 12256,9749 12280,9725 J5.16@12300,9725
NetJ5_17: J5.17 U4.17 | length 201.1
  Top Layer w12: U4.17@12101,9780 12295,9780 J5.17@12300,9775
NetJ5_18: J5.18 U4.18 | length 204.8
  Top Layer w12: U4.18@12101,9811 12201,9811 12215,9825 J5.18@12300,9825
NetJ5_19: J5.19 U4.19 | length 212.3
  Top Layer w12: U4.19@12101,9843 12188,9843 12220,9875 J5.19@12300,9875
NetJ5_20: J5.20 U4.20 | length 220.1
  Top Layer w12: U4.20@12101,9874 12182.23,9874 12233.23,9925 J5.20@12300,9925
NetJ5_21: J5.21 U4.21 | length 227.6
  Top Layer w12: U4.21@12101,9906 12176,9906 12245,9975 J5.21@12300,9975
NetJ5_22: J5.22 U4.22 | length 235.5
  Top Layer w12: U4.22@12101,9937 12170.23,9937 12258.23,10025 J5.22@12300,10025
NetJ5_23: J5.23 U4.23 | length 237.2
  Top Layer w12: U4.23@12013,10025 12013,10115 12015,10115 12100,10200 J5.23@12100,10225
NetJ5_24: J5.24 U4.24 | length 228.2
  Top Layer w12: U4.24@11982,10025 11982,10138.77 12050,10206.77 J5.24@12050,10225
NetJ5_25: J5.25 U4.25 | length 220.7
  Top Layer w12: U4.25@11950,10025 11950,10145 12000,10195 J5.25@12000,10225
NetJ5_26: J5.26 U4.26 | length 212.8
  Top Layer w12: U4.26@11919,10025 11919,10164 11950,10195 J5.26@11950,10225
NetJ5_27: J5.27 U4.27 | length 205.4
  Top Layer w12: U4.27@11887,10025 11890,10028 11890,10215 J5.27@11900,10225
NetJ5_28: J5.28 U4.28 | length 202.5
  Top Layer w12: J5.28@11850,10225 11856,10219 U4.28@11856,10025
NetJ5_29: J5.29 U4.29 | length 210.4
  Top Layer w12: J5.29@11800,10225 11800,10200 11825,10175 U4.29@11825,10025
NetJ5_30: J5.30 U4.30 | length 217.8
  Top Layer w12: J5.30@11750,10225 11750,10190 11793,10147 U4.30@11793,10025
NetJ5_31: J5.31 U4.31 | length 225.7
  Top Layer w12: J5.31@11700,10225 11700,10200 11762,10138 U4.31@11762,10025
NetJ5_32: J5.32 U4.32 | length 233.1
  Top Layer w12: J5.32@11650,10225 11650,10195 11730,10115 U4.32@11730,10025
NetJ5_33: J5.33 U4.33 | length 241
  Top Layer w12: J5.33@11600,10225 11600,10205 11699,10106 U4.33@11699,10025
NetJ5_34: J5.34 U4.34 | length 247.5
  Top Layer w12: J5.34@11400,10025 11448.54,10025 11536.54,9937 U4.34@11611,9937
NetJ5_35: J5.35 U4.35 | length 239.6
  Top Layer w12: J5.35@11400,9975 11461.77,9975 11530.77,9906 U4.35@11611,9906
NetJ5_36: J5.36 U4.36 | length 232.1
  Top Layer w12: J5.36@11400,9925 11475,9925 11526,9874 U4.36@11611,9874
NetJ5_37: J5.37 U4.37 | length 224.3
  Top Layer w12: J5.37@11400,9875 11485,9875 11517,9843 U4.37@11611,9843
NetJ5_38: J5.38 U4.38 | length 216.8
  Top Layer w12: J5.38@11400,9825 11495,9825 11509,9811 U4.38@11611,9811
NetJ5_39: J5.39 U4.39 | length 213.1
  Top Layer w12: J5.39@11400,9775 11405,9780 U4.39@11611,9780
NetJ5_40: J5.40 U4.40 | length 220.9
  Top Layer w12: J5.40@11400,9725 11406.57,9725 11430.57,9749 U4.40@11611,9749
NetJ5_41: J5.41 U4.41 | length 228.4
  Top Layer w12: J5.41@11400,9675 11410,9685 11440,9685 11472,9717 U4.41@11611,9717
NetJ5_42: J5.42 U4.42 | length 236.3
  Top Layer w12: J5.42@11400,9625 11425,9625 11486,9686 U4.42@11611,9686
NetJ5_43: J5.43 U4.43 | length 243.7
  Top Layer w12: J5.43@11400,9575 11411.77,9575 11490.77,9654 U4.43@11611,9654
NetJ5_44: J5.44 U4.44 | length 255.4
  Top Layer w12: J5.44@11400,9525 11406.57,9525 11440,9558.43 11440,9565 11498,9623 U4.44@11611,9623
NetJ6_1: Designator27.2 Designator27.4 J6.1 J7.3 | length 664.7
  Top Layer w40: Designator27.2@12583,10806 Designator27.4@12583,11056 12674,10965 J7.3@12730,10965 12730,10884 12829,10785 J6.1@12838,10785
NetJ6_2: Designator27.1 Designator27.3 J6.2 J7.2 | length 888.7
  Top Layer w40: J6.2@12838,11105 12830,11097 J7.2@12830,10965 12896,10899 12974,10899 13131,11056 Designator27.3@13233,11056 Designator27.1@13233,10806
NetJ6_3: Designator27.5 Designator27.6 J6.3 J7.1 | length 1085.2
  Top Layer w40: Designator27.6@12583,11306 12604,11285 J6.3@12838,11285 J6.3@12924,11285 ; J7.1@12930,10965 13045,11080 13045,11164 J6.3@12924,11285 ; Designator27.5@13233,11306 13212,11285 J6.3@12924,11285
NetJ8_1: J8.1 J10.1 J10.2 | length 1867.3
  Top Layer w40: J8.1@10452,9812 10408,9812 10366,9770 10366,9494 10436,9424 10556,9424 10942,9038 J10.1@11565,9038 J10.2@11565,8938
NetJ8_2: J8.2 J10.3 J10.4 | length 1690
  Top Layer w40: J8.2@10452,9712 10485,9712 10590,9607 10590,9477 10967,9100 11640,9100 11665,9075 J10.4@11665,8938
NetJ8_3: J8.3 J10.5 J10.6 | length 1659
  Bottom Layer w40: J8.3@10452,9612 10483,9612 10995,9100 11717,9100 11765,9052 J10.5@11765,9038 J10.6@11765,8938
NetJ8_4: J8.4 J10.7 J10.8 | length 1831.1
  Bottom Layer w40: J8.4@10452,9512 10498,9512 10968,9042 11351,9042 11523,8870 11838,8870 11865,8897 J10.8@11865,8938 J10.7@11865,9038
NetJ9_1: J9.1 J10.9 J10.10 | length 2451.6
  Bottom Layer w40: J9.1@10415,10241 10610.5,10045.5 10610.5,9568.5 10628,9551 10629,9551 11025,9155 11886,9155 11965,9076 J10.9@11965,9038 ; J10.9@11961,9038 11961,8942 J10.10@11965,8938
NetJ9_2: J9.2 J10.11 J10.12 | length 2413.9
  Top Layer w60: J9.2@10415,10085 10441,10085 10741,9785 10741,9434 11009,9166 11979,9166 12065,9080 J10.11@12065,9038 J10.12@12065,8938
NETK: DSP.11 J2.11 | length 546.5
  Top Layer w20: DSP.11@11312,11232 11390,11154 11528,11154 11712,10970 J2.11@11712,10932
NETL: DSP.12 J2.12 | length 722.5
  Top Layer w10: DSP.12@11212,11232 11240,11204 11270.7,11204 11291.7,11183 11349.7,11125 11515.99,11125 11663,10977.99 11663,10892 11712,10843 J2.12@11712,10832
NetLED_1: Balancer.4 LED.9 LED.10 | length 2572.8
  Top Layer w20: Balancer.4@12036,14511 11845,14702 11845,15511 11999,15665 12187.43,15665 12286.43,15764 12439,15764 v1(12475,15800)
  Bottom Layer w20: v1(12475,15800) 12510,15765 13005,15765 13040,15800 LED.9@13040,15850 LED.10@13040,15950
NetLED_2: Balancer.3 LED.7 LED.8 | length 2722
  Top Layer w20: Balancer.3@12036,14411 12026,14411 11975,14462 11975,14525 11813,14687 11813,15530 11982,15699 12179,15699 12274,15794 12405.36,15794 12466.36,15855 12520,15855 12580,15915 12580,15999 12585,16004 12896,16004 12940,15960 LED.8@12940,15950 LED.7@12940,15850 ; Balancer.3@12036,14415 Balancer.3@12040,14415
NetLED_3: Balancer.6 LED.3 LED.4 | length 923.7
  Top Layer w20: Balancer.6@12036,15561 12041,15561 12082.5,15602.5 12212.5,15602.5 12314,15704 12499,15704 12585,15790 12680,15790 LED.3@12740,15850 LED.4@12740,15950
NetLED_4: Balancer.5 LED.1 LED.2 | length 1028.8
  Top Layer w20: Balancer.5@12036,15461 12028,15461 11982,15507 11982,15602 12012.5,15632.5 12197.35,15632.5 12298.85,15734 12480,15734 12588,15842 12632,15842 LED.1@12640,15850 LED.2@12640,15950
NETM: DSP.13 J2.13 | length 657.1
  Top Layer w20: DSP.13@11112,11232 11169,11175 11258.69,11175 11303.35,11130.34 11337.69,11096 11503.98,11096 11612,10987.98 J2.13@11612,10932
NETN: DSP.14 J2.14 | length 831.9
  Top Layer w10: DSP.14@11012,11232 11098,11146 11240,11146 11319,11067 11490,11067 11561,10996 11561,10883 J2.14@11612,10832
NETO: DSP.15 J2.15 | length 779.3
  Top Layer w20: DSP.15@10912,11232 10917,11227 10917,11198 10994,11121 11229.64,11121 11312.64,11038 11471,11038 11512,10997 J2.15@11512,10932
NETP: DSP.16 J2.16 | length 1003.3
  Bottom Layer w20: DSP.16@10812,11232 10812,11183 10845,11150 11380,11150 11435,11095 11435,10909 J2.16@11512,10832
NetRL1_4: J29.5 J29.6 JCell.3 RL1.4 | length 1729.9
  Top Layer w40: RL1.4@10312,14449 10267,14404 10267,13978 10476,13769 JCell.3@10476,13737
  Bottom Layer w40: JCell.3@10476,13737 10476,13497 10503,13470 10597,13470 10696.5,13370.5 10696.5,13159.5 10674,13137 J29.6@10617,13137 J29.5@10517,13137
NetRL1_5: BATTERY.2 J29.11 J29.12 RL1.7 | length 2664.7
  Top Layer w60: BATTERY.2@10565,14125 10565,14276 10526,14315 10526,14811 10586,14871 RL1.7@10606,14871
  Bottom Layer w60: J29.11@10517,12837 10809.96,12837 11023,13050.04 11023,13366 10730,13659 10730,13963 BATTERY.2@10568,14125
NetRL2_4: J29.1 J29.2 JCell.1 RL2.4 | length 3237.7
  Bottom Layer w30: RL2.4@10608,15991 10441,15824 10441,15597 10240,15396 10240,15073 10456,14857 10456,14415 10276,14235 JCell.1@10276,13737 10276,13463 10402,13337 J29.1@10517,13337 J29.2@10617,13337
NetRL2_5: J29.3 J29.4 JCell.2 RL2.5 | length 3042.1
  Top Layer w40: RL2.5@10308,15991 10308,15919 10213,15824 10213,13947 10376,13784 JCell.2@10376,13737 10376,13716 10399,13693 10399,13423 10445,13377 10445,13270 10478,13237 J29.3@10517,13237 J29.4@10617,13237
NetU1_1: U1.1 U2.1 | length 793.9
  Top Layer w7: U1.1@14453.82,9766.09 14453.82,9979.82 14454,9980 14800,9980 14877,10057 U2.1@14877,10182
NetU1_3: U1.3 U2.3 | length 691.7
  Top Layer w7: U1.3@14422.32,9766.09 14422.32,10007.32 14425,10010 14520,10010 14600,10090 14683,10090 14725,10132 14767,10132 14777,10142 U2.3@14777,10182
NetU1_4: U1.4 U2.4 | length 653.5
  Top Layer w7: U1.4@14406.57,9766.09 14406.57,10021.57 14412,10027 14509,10027 14587,10105 14669,10105 14727,10163 U2.4@14727,10182
NetU1_5: U1.5 U2.5 | length 628.2
  Top Layer w7: U1.5@14390.83,9766.09 14390.83,10030.83 14402,10042 14501,10042 14580,10121 14641,10121 14677,10157 U2.5@14677,10182
NetU1_6: U1.6 U2.6 | length 599.3
  Top Layer w7: U1.6@14375.08,9766.09 14375.08,10035.08 14395,10055 14488,10055 14569,10136 14611,10136 14627,10152 U2.6@14627,10182
NetU1_7: U1.7 U2.7 | length 559.4
  Top Layer w7: U1.7@14359.33,9766.09 14359.33,10044.33 14385,10070 14476,10070 14577,10171 U2.7@14577,10182
NetU1_8: U1.8 U2.8 | length 538.7
  Top Layer w7: U1.8@14343.58,9766.09 14343.58,10053.58 14380,10090 14460,10090 14527,10157 U2.8@14527,10182
NetU1_9: U1.9 U2.9 | length 485.7
  Top Layer w7: U1.9@14327.83,9766.09 14327.83,10062.83 14375,10110 14445,10110 14477,10142 14477,10149